# Altium PCB STM32H743I-EVAL2PCBDESIGN.PcbDoc (part 23 of 23)
Units mil, origin at the board's own origin, x right, y up, seen from the top; angles counter-clockwise.
Board outline 6558 x 5417 mil, 8 copper layers (L1_TOP, L2_GND, L3_HS1, L4_POWER, L5_SIG, L6_HS2, L7_GND, L8_BOTTOM), stack 61.368 mil thick; 620 components, 588 nets, 2945 pads, 1724 vias.
Unrouted connection lines stored in the file: 1.
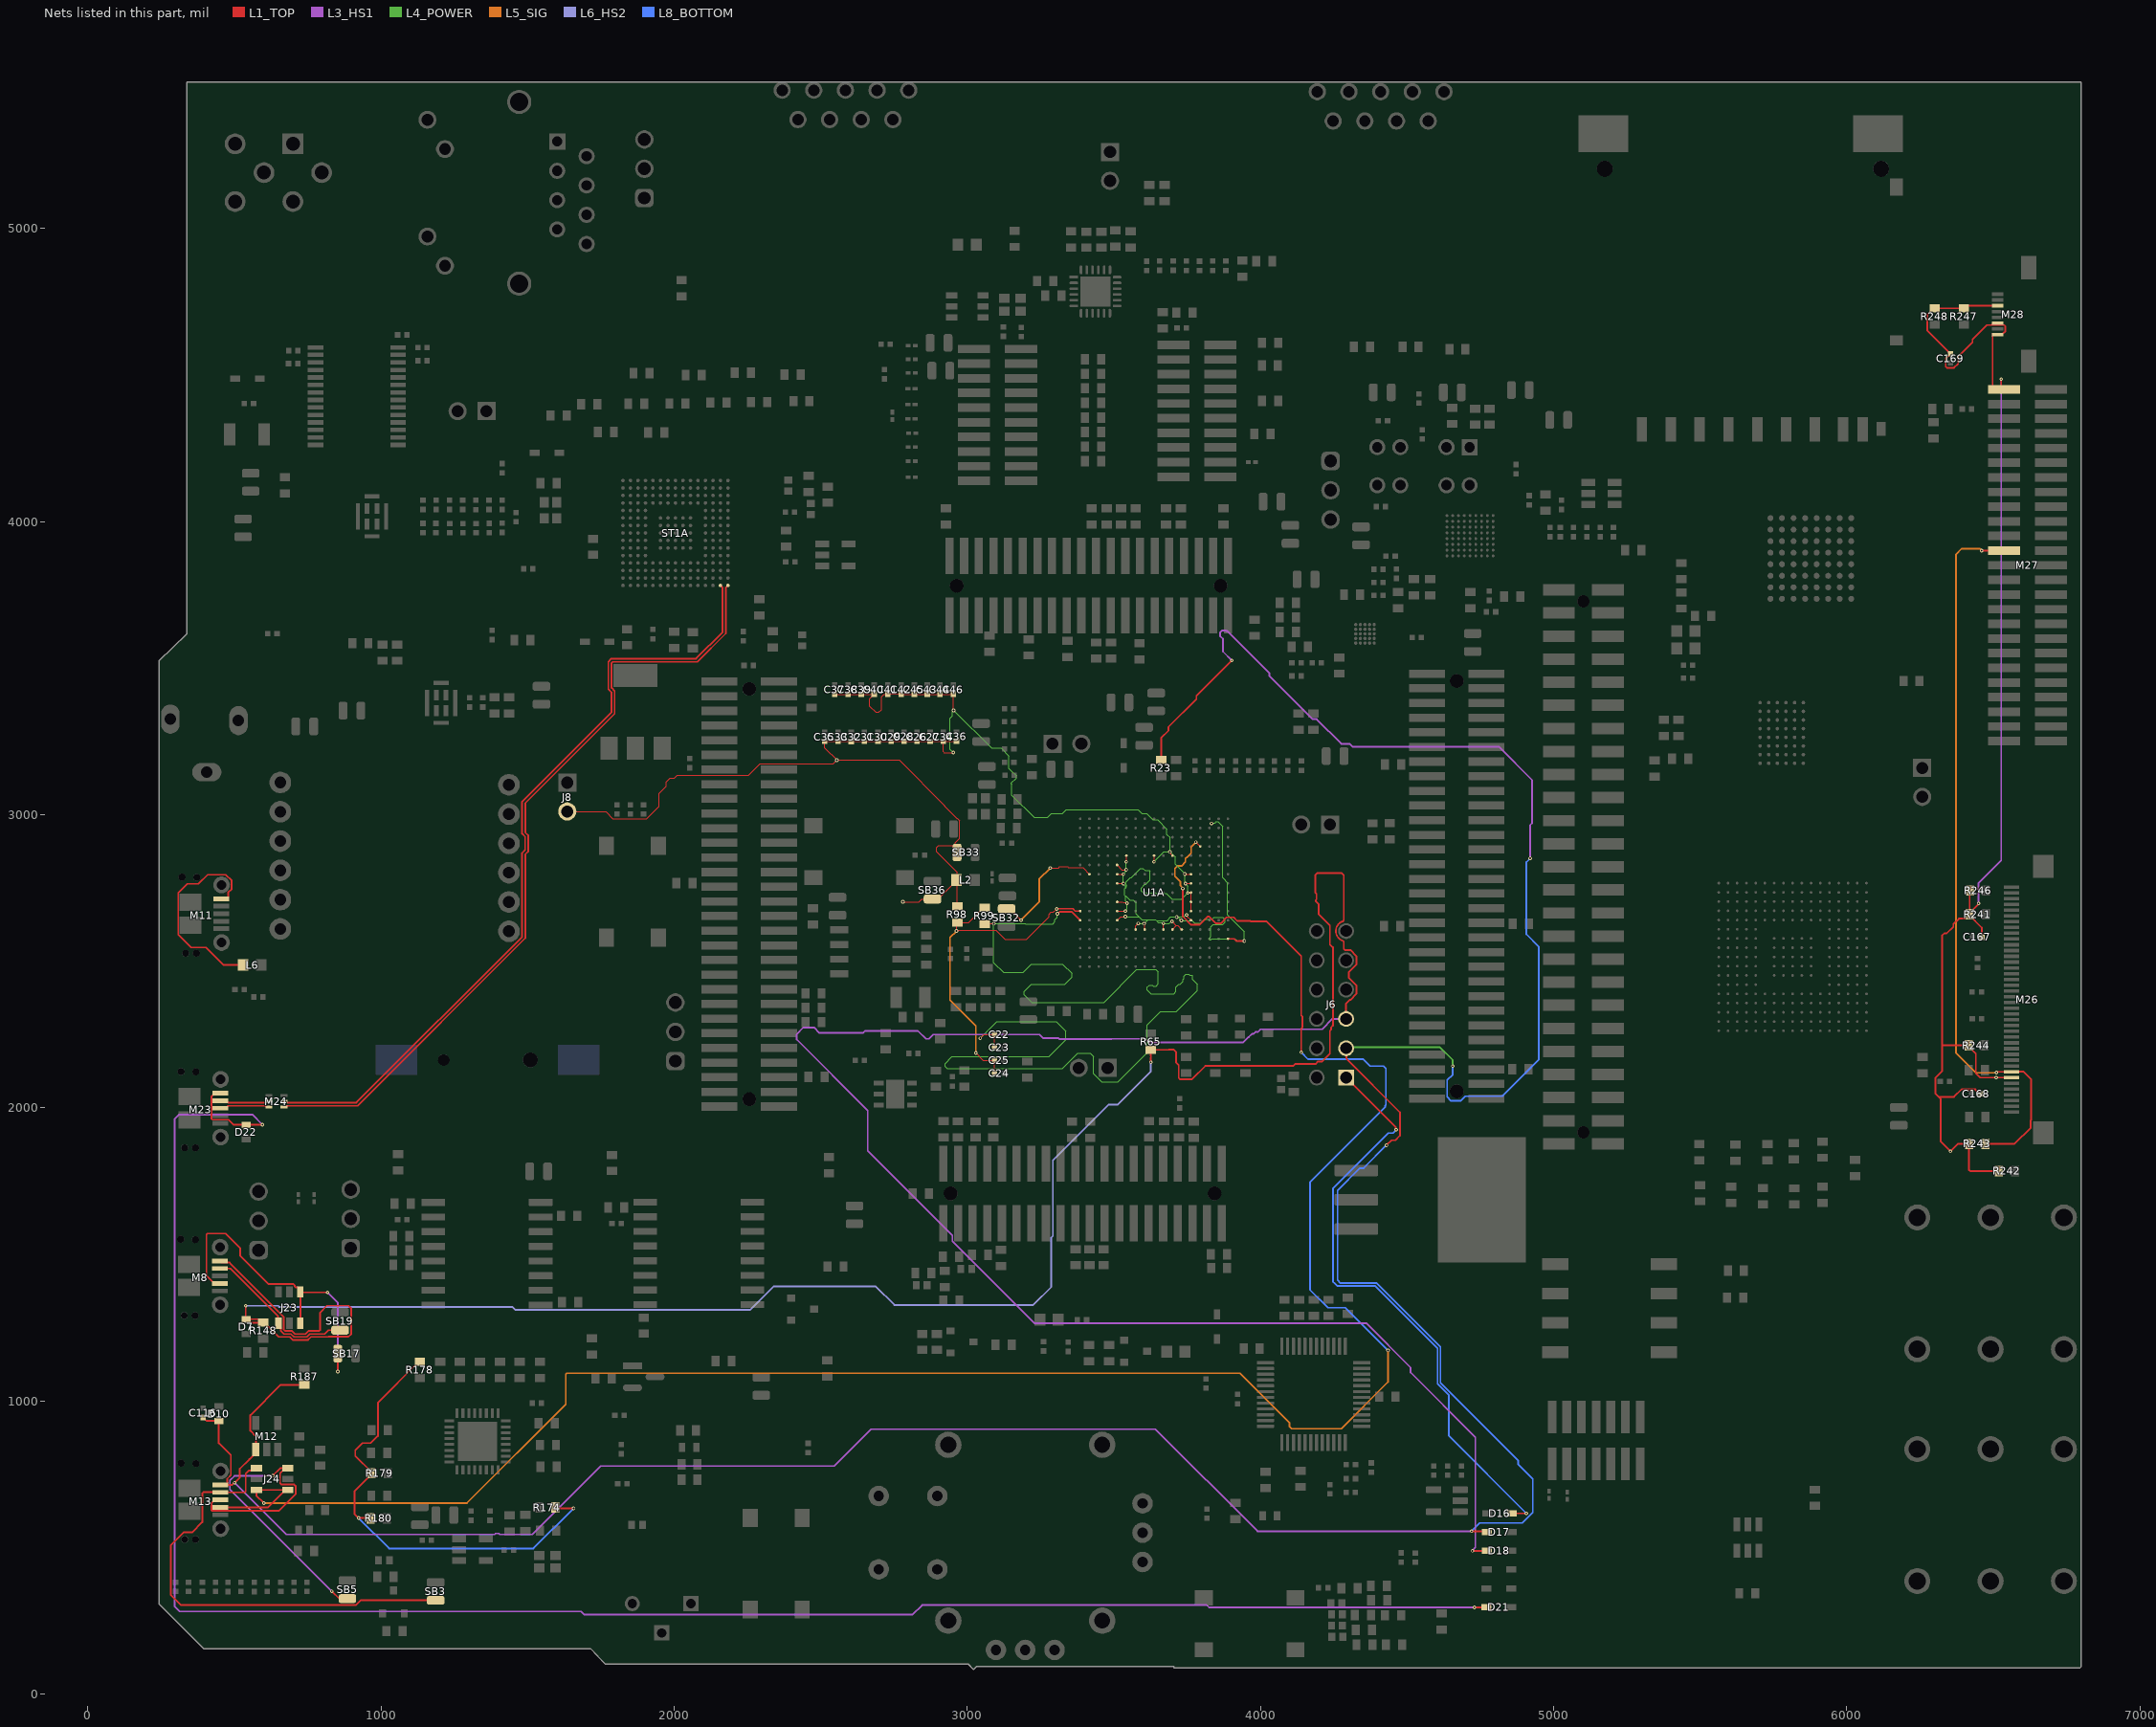
[diagram p20: the nets of this part, all layers, seen from the top]

## Via types
v1: diameter 12, hole 6, L1_TOP to L8_BOTTOM, tented both sides, 1724 vias

## Nets (pads, with @x,y where several pads share a name; then routed paths per layer and width w, separated by ;. In a path a pad name is that pad's centre, name@x,y a point inside that pad or via, vN(x,y) a via of type N, cw(c..) or ccw(c..) an arc to the next point about the centre after c; other vN are vias at no path point) (continued)
USB_DEV_HS_CN_N: M23.2 M24.5 | length 170.5
  L1_TOP w6: M23.2@451.31,2023.96 456.31,2018.96 477.03,2018.96 478.33,2017.66 606.18,2017.66 610.52,2022 M24.5@617.41,2022
USB_DEV_HS_CN_P: M23.3 M24.6 | length 171.3
  L1_TOP w6: M23.3@451.31,1998.37 469.81,1998.37 478.1,2006.66 606.18,2006.66 610.52,2002.31 M24.6@617.41,2002.31
USB_DEV_HS_N: M24.2 ST1A.R14 | length 2719.5
  L1_TOP w6: M24.2@668.59,2022 675.48,2022 679.82,2017.66 915.3,2017.66 1481,2583.36 1481,2869.22 1491,2879.22 1491,2924.78 1481,2934.78 1481,3044.3 1785.56,3348.86 1785.56,3417.83 1775.2,3428.19 1775.2,3521.84 1785.74,3532.39 2074.39,3532.39 2165.02,3623.02 2165.02,3774.75 ST1A.R14@2157.72,3782.05
USB_DEV_HS_P: M24.1 ST1A.R15 | length 2737.7
  L1_TOP w6: M24.1@668.59,2002.31 675.48,2002.31 679.82,2006.66 919.85,2006.66 1492,2578.8 1492,2864.66 1502,2874.66 1502,2929.34 1492,2939.34 1492,3039.75 1796.56,3344.31 1796.56,3422.38 1786.2,3432.75 1786.2,3517.28 1790.3,3521.39 2078.94,3521.39 2176.02,3618.46 2176.02,3774.75 ST1A.R15@2183.31,3782.05
USB_FS1_DM: J23.4 M8.2 SB19.1 | length 540.4
  L1_TOP w6: M8.2@449.61,1451.59 483.41,1451.59 484,1451 486.4,1451 648.41,1288.99 648.41,1265.44 J23.4@649.6,1264.25 649.6,1256 657.6,1248 657.6,1239.36 668.96,1228 692.22,1228 702.22,1218 746.59,1218 756.59,1228 806.65,1228 819.65,1241 SB19.1@860,1241
USB_FS1_ID: J23.1 J23.6 M8.4 SB17.1 | length 1169.2
  L1_TOP w6: M8.4@449.61,1400.41 431.11,1400.41 420.66,1410.86 420.35,1410.86 404.09,1427.12 404.09,1438.56 404.09,1567.09 407.93,1570.93 469.86,1570.93 519,1521.78 519,1495 616,1398 700.9,1398 705,1393.9 705,1390.36 708.51,1386.84 716.4,1386.84 724.4,1378.84 J23.1@724.4,1371.75 ; J23.6@724.4,1264.25 J23.1@724.4,1371.75 ; v1(817,1370) 726.15,1370 J23.1@724.4,1371.75 ; v1(852,1100) SB17.1@852,1161
  L3_HS1 w6: v1(817,1370) 852,1335 v1(852,1100)
USB_FS2_DM: J24.4 M13.2 SB3.1 | length 1588.3
  L1_TOP w6: J24.4@574.25,770.4 566.25,762.4 549.36,762.4 538,751.04 538,691.11 534.49,687.59 M13.2@451.61,687.59 451.14,688.06 393.57,688.06 390.05,684.55 390.05,654.74 390.05,586.05 354.86,550.86 325.57,550.86 282.7,507.98 282.7,337.22 316.92,303 913.51,303 929.51,319 SB3.1@1186,319
USB_FS2_DP: J24.3 M13.3 SB5.1 | length 1314.2
  L1_TOP w6: M13.3@451.61,662 433.11,662 421.11,650 421.11,626.75 423.45,624.41 650.71,624.41 708,681.7 708,709.5 703.2,714.3 660.3,714.3 655.5,719.1 655.5,752.4 J24.3@673.5,770.4 ; v1(630,744) 656.4,770.4 J24.3@673.5,770.4 ; J24.3@681.75,770.4 J24.3@673.5,770.4 ; v1(832,350) 857,325 SB5.1@885,325
  L3_HS1 w6: v1(630,744) 500,744 484,728 484,698 v1(832,350)
USB_FS2_ID: J24.1 J24.6 M13.4 U1A.D14 | length 7431
  L1_TOP w2: v1(3779.53,2906.46) U1A.D14@3794.5,2891.49
  L1_TOP w6: M13.4@451.61,636.41 614.31,636.41 J24.1@673.5,695.6 ; v1(600,651) 574.25,676.75 J24.6@574.25,695.6 J24.1@673.5,695.6 ; J24.1@681.75,695.6 J24.1@673.5,695.6 ; v1(3735,2748) 3735,2652.62 3763.62,2624 3790.9,2624 3818.9,2652 3825.43,2652 3848.43,2629 3864.32,2629 3884.84,2649.52 3908.46,2649.52 3920.98,2637 3965.62,2637 3966.62,2636 4020.38,2636 4139,2517.38 4139,2314.7 4143.45,2310.26 4143.45,2274.64 4139,2270.19 v1(4139,2189)
  L5_SIG w6: v1(600,651) 1293,651 1630,988 1630,1090.49 1633.51,1094 3930,1094 4098.78,925.22 4098.78,912.18 4106.4,904.56 4275.63,904.56 4435,1063.93 v1(4435,1172) ; v1(3735,2748) 3735,2749.62 3727,2757.62 3727,2770.38 3708,2789.38 3708,2816.62 3716.39,2825 3730.53,2825 3744,2838.47 3744,2850.49 3747.51,2854 3748.53,2854 3763.45,2868.93 3763.45,2889.35 3779.53,2905.43 v1(3779.53,2906.46)
  L8_BOTTOM w6: v1(4139,2189) 4162.62,2165.38 4351,2165.38 4374.38,2142 4420.38,2142 4428,2134.38 4428,2010.34 4425,2007.34 4425,2001.72 4169,1745.72 4169,1378.9 4230.45,1317.45 4289.55,1317.45 v1(4435,1172)
VBUS-HS: L6.2 M11.1 | length 709
  L1_TOP w6: M11.1@454.61,2713.18 473.11,2713.18 478.11,2718.18 478.11,2734.15 490.09,2746.13 490.09,2774.72 469.88,2794.93 408.21,2794.93 377.01,2763.73 338.99,2763.73 307.8,2732.53 307.8,2591.47 352.27,2547 402.83,2547 462.83,2487 L6.2@528.9,2487
VBUS_FS1: D7.1 D18.2 J6.05 M8.1 R65.1 R148.1 | length 12508.7
  L1_TOP w6: M8.1@449.61,1477.18 454.61,1472.18 476.56,1472.18 476.62,1472.11 481.88,1472.11 487.41,1466.59 667.6,1286.4 667.6,1243.5 673.1,1238 696.36,1238 706.36,1228 742.44,1228 752.44,1238 788.49,1238 792,1241.51 792,1301.38 814.62,1324 888.51,1324 898,1314.51 898,1228.49 888.51,1219 821.2,1219 820.2,1218 760.73,1218 750.73,1208 698.08,1208 688.08,1218 650.55,1218 612.77,1255.78 612.72,1255.78 609.72,1258.78 609.72,1277.34 604.19,1277.34 602.97,1278.56 D7.1@544.92,1278.56 ; v1(538,1324) 538,1279.61 D7.1@540,1277.61 ; D7.1@544.92,1277.61 555.97,1266.56 R148.1@598,1266.56 ; v1(3626,2155) 3626,2171.32 3626.22,2171.54 3626.22,2176.51 3626,2176.73 R65.1@3626,2197.44 3686.62,2197.44 3687.18,2198 3704.38,2198 3712,2190.38 3712,2154.85 3721.28,2145.57 3721.28,2101.76 3725.38,2097.66 3766.62,2097.66 3811.73,2142.78 4111.16,2142.78 4117.62,2149.24 4187.73,2149.24 4196.5,2158 4210.64,2158 4237,2184.36 4237,2198.5 4237,2262.72 4241,2266.72 4241,2274.22 4247,2280.22 4247,2547.28 4237,2557.28 4237,2621.64 4199,2659.64 4199,2693.69 4188.95,2703.74 4188.95,2708.71 4191.35,2711.12 4191.35,2730.17 4187,2734.53 4187,2793.38 4194.62,2801 4276,2801 4284,2793 4284,2639.05 4282.24,2637.29 4281.26,2636.31 ccw(c4292,2603) 4281.26,2569.69 4282.24,2568.71 4284,2566.95 4284,2541.51 4287.51,2538 4306.5,2538 4327,2517.5 4327,2488.5 4301.11,2462.61 4301.11,2443.39 4306.5,2438 4327,2417.5 4327,2388.5 4306.5,2368 4304,2368 4292,2356 J6.05@4292,2303 ; v1(4723,488) D18.2@4771.87,488
  L3_HS1 w6: J6.05@4292,2303 4245.76,2303 4210.76,2268 4000.82,2268 3991.23,2258.41 3983.08,2258.41 3977.38,2252.72 3972,2252.72 3960.28,2241 3959.67,2241 3941.67,2223 3619.62,2223 3607.62,2235 3491.33,2235 3490.33,2234 3314.47,2234 3311.47,2237 3258.57,2237 3245.57,2250 2884.38,2250 2869.38,2235 2858.62,2235 2831.62,2262 2650.57,2262 2643.57,2255 2495.67,2255 2476.67,2274 2440.51,2274 2418,2251.49 2418,2232.57 2660,1990.57 2660,1852.72 2949,1563.72 2949,1544.62 3228.62,1265 4360.38,1265 4512,1113.38 4512,1096.62 4733,875.62 4733,499.21 4723,489.21 v1(4723,488)
  L6_HS2 w6: v1(538,1324) 648.62,1324 652.62,1320 1448.88,1320 1458.88,1310 2259.14,1310 2339.14,1390 2687.93,1390 2750.93,1327 3225,1327 3286,1388 3286,1556.47 3292,1562.47 3292,1820.38 3482.62,2011 3513.47,2011 3626,2123.53 v1(3626,2155)
VBUS_FS2: C116.1 D10.1 D17.2 J6.03 M12.1 M13.1 R23.1 R187.1 | length 11544.2
  L1_TOP w6: C116.1@393,943.17 393.08,943.17 404.86,931.39 D10.1@446,931.39 446,855.4 487.09,814.3 487.09,746.13 475.11,734.15 475.11,718.18 M13.1@470.11,713.18 ; M13.1@451.61,713.18 M13.1@470.11,713.18 ; R187.1@738,1054.44 657.43,1054.44 553.79,950.8 553.79,897.75 572.6,878.94 M12.1@572.6,833.72 572.6,821.91 551.46,800.77 550.33,800.77 518,768.44 518,738 v1(500,720) 498.38,720 491.56,713.18 M13.1@470.11,713.18 ; R23.1@3661,3186.56 3661,3261.33 3686,3286.33 3686,3299 3781.6,3394.6 3781.6,3405.78 v1(3902.2,3526.37) ; J6.03@4292,2203 4293.31,2201.69 4293.31,2167 4476,1984.31 4476,1905 4460.07,1889.07 4447.07,1889.07 v1(4430,1872) ; v1(4720,555) 4769.87,555 D17.2@4772.87,552
  L3_HS1 w6: v1(500,720) 676,544 1387.62,544 1390.62,547 1401.38,547 1404.38,544 1515.05,544 1748.55,777.5 2545.64,777.5 2671.14,903 3641.71,903 3989.71,555 v1(4720,555) ; v1(3902.2,3526.37) 3872,3556.57 3872,3600.12 3862,3610.12 3862,3620.89 3869.62,3628.5 3880.38,3628.5 3881.89,3627 3885.28,3627 4030.63,3481.66 4030.63,3472.85 4177.47,3326 4191.62,3326 4275.62,3242 4303.47,3242 4313.47,3232 4812.41,3232 4927,3117.41 4927,2971.37 4920,2964.37 v1(4920,2851)
  L4_POWER w6: J6.03@4292,2203 4295,2206 4612.47,2206 4656,2162.47 v1(4656,2142)
  L8_BOTTOM w6: v1(4430,1872) 4351.93,1793.93 4338.93,1793.93 4263,1718 4263,1412 4273.5,1401.5 4396.5,1401.5 4614,1184 4614,1062 4879,797 4879,783.47 4929,733.47 4929,619.62 4892.77,583.38 4748.38,583.38 v1(4720,555) ; v1(4656,2142) 4656,2113.38 4637,2094.38 4637,2037 4650.43,2023.57 4682.93,2023.57 4698.35,2039 4824,2039 4949,2164 4949,2550.19 4907,2592.19 4907,2838 v1(4920,2851)
VBUS_HS: D16.2 J6.01 | length 2054.6
  L1_TOP w6: J6.01@4292,2103 4461.85,1933.15 4461.85,1926.15 v1(4463,1925) ; D16.2@4858.13,616 v1(4907,616)
  L8_BOTTOM w6: v1(4463,1925) 4451.72,1913.72 4436,1913.72 4247,1724.72 4247,1406.51 4251.51,1402 4251.86,1402 4262.36,1391.5 4391.5,1391.5 4604,1179 4604,1057.43 4642.93,1018.5 4642.93,880.07 v1(4907,616)
VDD: C167.1 C168.1 C169.1 M26.7 M27.50 M28.1 M28.3 M28.6 R241.2 R242.2 R243.2 R244.2 R246.2 R247.2 R248.2 | length 4790.4
  L1_TOP w6: R246.2@6420.44,2741 6419.44,2740 6419.44,2700 6419.44,2663.94 6448.85,2693.35 6448.85,2695.85 v1(6450,2697) ; C168.1@6457.83,2047 6457.83,2047.08 6451.62,2053.3 6445.9,2053.3 6442.38,2056.82 6442.38,2059.2 6438.28,2063.3 6392.51,2063.3 6366.1,2036.89 6313.79,2036.89 ; C167.1@6460.83,2582 6460.83,2614.67 6419.44,2656.06 6408.66,2645.28 6382.9,2645.28 6364,2626.38 6364,2617.72 6341.28,2595 6332.62,2595 6325,2587.38 6325,2213 ; M28.1@6514.56,4638.1 6514.56,4638.37 6511.92,4641.01 6498.5,4641.01 6497.87,4640.38 6497.87,4462.5 6509.37,4451 M27.50@6537,4451 6527,4461 v1(6527,4486) ; M28.1@6514.56,4641.01 6531.24,4641.01 6535.12,4644.88 6537.14,4644.88 6541.24,4648.98 6541.24,4666.59 6537.14,4670.69 6494,4670.69 ; M28.3@6514.56,4677.47 6500.78,4677.47 6494,4670.69 ; M28.6@6514.56,4736.53 6408.97,4736.53 R247.2@6400,4727.56 R248.2@6300,4727.56 6296.06,4727.56 6275.28,4706.78 6275.28,4651.46 6353.92,4572.83 6337.7,4556.62 6337.7,4529.05 6341.8,4524.95 6366.2,4524.95 6380.3,4539.05 6380.3,4563.45 6429.09,4612.24 6429.09,4622.09 6477.69,4670.69 6494,4670.69 ; R242.2@6519.44,1784 6420.96,1784 6417.44,1787.51 R243.2@6417.44,1877 6380,1877 v1(6354,1851) 6321,1884 6321,2029.68 6313.79,2036.89 ; M26.7@6562.06,2103.21 6561.98,2103.13 6510.13,2103.13 v1(6510,2103) 6455.16,2103 6440.55,2117.61 6440.55,2183.95 6415.44,2209.06 R244.2@6415.44,2213 6325,2213 ; 6313.79,2036.89 6302.78,2047.9 6302.78,2102.2 6325,2124.42 6325,2213
  L3_HS1 w6: v1(6450,2697) 6450,2767 6527,2844 v1(6527,4486)
VDD_IO: R174.1 R178.1 R179.1 R180.1 | length 1633.7
  L1_TOP w6: R180.1@964.44,599 963.44,600 v1(923,600) 909,614 909,690.62 967.44,749.06 R179.1@967.44,753 967.44,756.94 912,812.38 912,831.38 936.28,855.66 964.5,855.66 988.78,879.94 988.78,993.28 1128.06,1132.56 R178.1@1132,1132.56 ; R174.1@1594.56,636 1597.84,632.72 v1(1656.43,632.72)
  L8_BOTTOM w6: v1(923,600) 1027,496 1519.71,496 v1(1656.43,632.72)
VDD_MCU: C26.1 C27.1 C28.1 C29.1 C30.1 C31.1 C32.1 C33.1 C34.1 C35.1 C36.2 C37.1 C38.1 C39.1 C40.1 C41.1 C42.1 C43.1 C44.1 C45.1 C46.1 J8.2 L2.1 R98.2 SB33.1 SB36.1 U1A.E6 U1A.E9 U1A.E11 U1A.F5 U1A.G5 U1A.G13 U1A.H5 U1A.H13 U1A.J13 U1A.K5 U1A.K13 U1A.L5 U1A.L13 U1A.M5 U1A.M13 U1A.N7 U1A.N8 U1A.N10 U1A.N11 U1A.N12 U1A.P17 | length 7284.9
  L1_TOP w4: J8.2@1635,3011 1766.55,3011 1790.77,2986.78 1906.62,2986.78 1948.32,3028.49 1948.32,3072.29 1973,3096.97 1973,3111.11 1985.89,3124 2000.03,3124 2010.03,3134 2253.5,3134 2293.5,3174 2543,3174 v1(2555,3186) ; C37.1@2547,3411.17 C38.1@2593,3411.17 C39.1@2638,3411.17 C40.1@2682,3411.17 2667,3396.17 2667,3370.07 2687.75,3349.31 2697.7,3349.31 2707.3,3358.92 2707.3,3402.43 2716.04,3411.17 C41.1@2729,3411.17 2729.17,3411.33 C42.1@2774,3411.33 2774.17,3411.17 C45.1@2819,3411.17 C43.1@2863,3411.17 C44.1@2907,3411.17 C46.1@2952,3411.17 2953,3410.17 v1(2953,3356) ; v1(2780,2703) 2781,2702 2835,2702 2845,2712 SB36.1@2881,2712 2891.14,2722.14 2909.62,2722.14 L2.1@2963.69,2776.21 ; v1(2952,3212) 2920.34,3212 2918,3214.34 C34.1@2918,3250 ; L2.1@2962.9,2777 L2.1@2963.69,2776.21 ; C36.2@2963,3250.17 2918.17,3250.17 C34.1@2918,3250 ; SB33.1@2965,2871 SB33.1@2959,2877 ; R98.2@2966,2686.56 2966,2773.9 L2.1@2963.69,2776.21 ; U1A.M5@3511.03,2639.52 3511.88,2639.52 3524.36,2652 v1(3539,2652) ; U1A.L5@3511.03,2671.02 v1(3539,2671) ; U1A.K5@3511.03,2702.51 3530.32,2702.51 3533.3,2699.53 3543.47,2699.53 v1(3545,2698) ; U1A.H5@3511.03,2765.5 v1@3531.5,2765.5 ; U1A.G5@3511.03,2797 v1@3531.5,2797 ; U1A.F5@3511.03,2828.5 3527.53,2812 v1(3542,2812) ; v1(3542,2839) 3542.53,2839.53 U1A.E6@3542.53,2859.99 ; U1A.N7@3574.02,2608.02 3574.62,2608.62 3574.62,2620.41 3583,2628.79 v1(3583,2629) ; v1(3603,2628) 3603,2625.84 3605.52,2623.32 U1A.N8@3605.52,2608.02 ; v1@3637.02,2839.53 U1A.E9@3637.02,2859.99 ; U1A.N10@3668.51,2608.02 v1@3668.51,2628.49 ; v1(3691,2873) 3692.53,2871.47 3692.53,2867.47 U1A.E11@3700.01,2859.99 ; v1(3698,2636) 3712,2622 ; U1A.N11@3700.01,2608.02 3712,2620.02 3712,2622 ; U1A.N12@3731.5,2608.02 3717.53,2622 3712,2622 ; v1@3742.54,2797 U1A.G13@3763,2797 ; v1(3744,2765) 3744.25,2765.25 3762.75,2765.25 U1A.H13@3763,2765.5 ; v1(3748,2658) 3749.53,2656.47 3749.53,2652.99 U1A.M13@3763,2639.52 ; v1(3752,2733) 3753.01,2734.01 U1A.J13@3763,2734.01 U1A.K13@3763,2702.51 U1A.L13@3763,2671.02 ; v1(2555,3186) 2767.09,3186 2923,3030.09 2923,3027.75 2963.75,2987 2966.09,2987 2974,2979.09 2974,2918.9 2959,2903.9 SB33.1@2959,2877 ; v1(2555,3186) 2513,3228 C35.1@2513,3250 C33.1@2559,3250 2559.17,3249.83 C32.1@2604,3249.83 2604.17,3250 C31.1@2649,3250 C30.1@2695,3250 C29.1@2740,3250 2740.17,3250.17 C28.1@2784,3250.17 2784.17,3250 C26.1@2828,3250 C27.1@2873,3250 C34.1@2918,3250 ; SB33.1@2959,2877 2952.42,2883.58 2952.42,2894.86 2901.31,2894.86 2894.28,2887.83 2894.28,2874.07 2965,2803.35 2965,2777.53 L2.1@2963.69,2776.21
  L1_TOP w6: U1A.P17@3888.98,2576.53 3909.74,2576.53 3917.27,2569 v1(3945,2569)
  L4_POWER w4: v1(2952,3212) 2941,3223 2941,3329.13 2949,3337.13 2949,3349.84 2953,3353.84 v1(2953,3356) 2954.08,3354.92 3082,3227 3114.73,3227 3142,3199.73 3142,3158.03 3150,3150.03 3150,3149.49 3167.02,3132.47 3167.02,3125.02 3150.37,3108.37 3150.37,3105.06 3152,3103.43 3152,3066.75 3227.75,2991 3273.23,2991 3286.23,3004 3324.25,3004 3337.25,3017 3582.13,3017 3595.13,3004 3611.11,3004 3633.11,2982 3648.97,2982 3681,2949.97 3681,2931.89 3691,2921.89 v1(3691,2873) ; v1(3539,2652) 3585.03,2652 ; v1(3539,2671) 3539,2673.16 3545,2679.16 v1(3545,2698) 3545,2700.16 3539.21,2705.95 3539.21,2723.33 ; v1(3542,2839) v1(3542,2812) 3540.51,2810.51 3540.51,2804.95 v1(3532.02,2796.47) v1(3532.02,2764.98) 3532.02,2762.81 3539.21,2755.62 3539.21,2750.08 ; v1(3583,2629) 3583.5,2628.5 3602.5,2628.5 v1(3603,2628) ; v1@3604,2629 3616.02,2641.02 ; v1(3636.49,2839) 3670.49,2873 v1(3691,2873) ; v1(3669.04,2629.02) 3688.85,2629.02 3695.84,2636 v1(3698,2636) ; v1@3669.04,2632 3651.53,2632 3645.51,2638.02 ; v1@3719.78,2650.75 3738.59,2650.75 3745.84,2658 v1@3747.03,2658 ; v1(3833,2970) 3834.53,2971.53 3844.7,2971.53 3848.66,2975.5 3855.5,2975.5 3871,2960 3871,2784.5 3887.5,2768 3887.5,2658.5 3945,2601 v1(3945,2569) 3921.11,2569 3914.11,2576 3833.89,2576 3830.89,2573 3827.57,2573 3825.23,2575.34 3825.23,2578.66 3830.5,2583.93 3830.5,2617.47 3838.03,2625 3870.73,2625 3879.41,2633.68 3879.41,2641.14 3871.54,2649 3841.4,2649 3835.4,2643 3808.89,2643 3795.89,2630 3774.97,2630 3765.97,2639 v1(3730,2639) 3719.78,2649.22 3715.78,2649.22 v1(3714.25,2650.75) 3693.91,2650.75 3681.19,2638.02 3645.51,2638.02 ; 3539.21,2723.33 3547.54,2715 3548.1,2715 3555.1,2708 3565.97,2708 3575.5,2698.47 3575.5,2661.53 3585.03,2652 ; 3539.21,2723.33 3537,2725.54 3537,2747.87 3539.21,2750.08 ; 3539.21,2750.08 3543.06,2753.92 3543.06,2759.04 3541.03,2761.06 3541.03,2771 3555.56,2785.53 3559.8,2785.53 3590.37,2816.1 3598.93,2816.1 3606.03,2809 3615.97,2809 3617.46,2810.49 3620.77,2810.49 3623.12,2808.15 3623.12,2777 3608.11,2762 3605.51,2762 3592.99,2749.48 3592.99,2739.54 3600.33,2732.21 3642.68,2732.21 3643.89,2731 3679.25,2731 3698.25,2712 3731,2712 v1(3752,2733) 3752,2756.03 3744,2764.03 v1(3744,2765) 3743,2766 3743,2794.37 3742.01,2795.36 v1(3742.01,2797.53) 3709,2830.54 3709,2855 v1(3691,2873) ; 3585.03,2652 3595.03,2642 3616.02,2642 3641.53,2642 3645.51,2638.02
VDD_SDC: SB32.1 U1A.G2 | length 430.3
  L1_TOP w4: v1(3283,2818) 3311.4,2818 3315.4,2822 3341.64,2822 3344.13,2819.5 3394.04,2819.5 U1A.G2@3416.54,2797
  L1_TOP w6: SB32.1@3134,2679 3144.34,2679 3181.04,2642.3 3181.04,2641.96 v1(3183,2640)
  L5_SIG w6: v1(3183,2640) 3245,2702 3245,2780 v1(3283,2818)
VDDA: C24.1 C25.1 R98.1 R99.2 U1A.L1 | length 1213.7
  L1_TOP w4: R98.1@2966,2631.44 R98.1@2969.94,2631.44 ; v1(3029,2187) 3054,2162 C25.1@3093,2162 3093.17,2161.83 C24.1@3093.17,2117 ; R99.2@3059,2682.56 3055.06,2682.56 3003.94,2631.44 R98.1@2969.94,2631.44 ; v1(3305,2678) 3294,2667 3286.03,2667 3279,2659.97 3279,2652 3202,2575 3127.91,2575 3096.91,2606 2971.66,2606 2970.19,2604.53 2964.53,2604.53 v1(2963,2603) 2963,2604.53 2963,2624.5 R98.1@2969.94,2631.44
  L1_TOP w6: v1(3305,2678) 3306.03,2679.03 3359.68,2679.03 3367.69,2671.02 U1A.L1@3385.05,2671.02
  L5_SIG w6: v1(2963,2603) 2941,2581 2941,2366.67 3029,2278.67 v1(3029,2187)
VREF+: C22.1 C23.1 R99.1 U1A.M1 | length 3950.7
  L1_TOP w4: v1(3044,2237) 3057,2250 C22.1@3093,2250 3093,2206.17 C23.1@3093.17,2206 ; R99.1@3059,2627.44 3059.56,2628 v1(3090,2628)
  L1_TOP w6: v1(3307,2662) 3308.62,2662 3315.65,2669.03 3355.54,2669.03 U1A.M1@3385.05,2639.52
  L4_POWER w4: v1(3044,2237) 3101.09,2294.09 3303.88,2294.09 3336,2261.97 3336,2232.03 3278.97,2175 2948.03,2175 2924,2150.97 2924,2141.03 2931.03,2134 3324.25,2134 3376.25,2186 3418.97,2186 3430.42,2174.55 3430.42,2116.12 3458.54,2088 3513.39,2088 3613.83,2188.43 3613.83,2282.8 3659.03,2328 3712.97,2328 3784.99,2400.02 3784.99,2420.98 3768.97,2437 3768.97,2453 3758.97,2453 3755.97,2456 3745.34,2456 3739,2449.66 3739,2441.11 3736,2438.11 3736,2430.73 3726.12,2420.85 3721.88,2420.85 3712,2410.97 3712,2396.03 3704.97,2389 3626.03,2389 3614,2401.03 3614,2410.97 3621.03,2418 3631,2418 3634,2415 3643.97,2415 3651,2422.03 3651,2462.97 3642.97,2471 3577.97,2471 3466.86,2359.89 3219.14,2359.89 3193,2386.03 3193,2395.97 3217.53,2420.5 3332.47,2420.5 3357,2445.03 3357,2458.11 3325.11,2490 3218.13,2490 3190.13,2462 3123.03,2462 3090,2495.03 v1(3090,2628) 3197.23,2628 3198.23,2627 3290.97,2627 3298.22,2634.25 3298.22,2642.3 3305.92,2650 3305.92,2660.92 v1(3307,2662)
VSYNC: M26.8 M27.28 R243.1 | length 2517.7
  L1_TOP w6: v1(6460,3901) M27.28@6537,3901 ; R243.1@6472.56,1877 6573,1877 6627.94,1931.94 6627.94,1956.55 6629,1957.6 6629,2098 6604.06,2122.94 M26.8@6562.11,2122.94 6561.64,2122.47 6515.09,2122.47 6512.62,2120 v1(6511,2120)
  L5_SIG w6: v1(6460,3901) 6453,3908 6392.51,3908 6373,3888.49 6373,2186.28 6440.28,2119 6510,2119 v1(6511,2120)
VUSB_ST_LINK: D21.2 D22.1 M23.1 | length 6781.3
  L1_TOP w6: M23.1@451.31,2049.55 432.81,2049.55 420.81,2037.55 420.81,1963.12 424.75,1959.19 479.47,1959.19 497.05,1941.61 D22.1@539,1941.61 539.39,1942 v1(595,1942) ; v1(4730,295) 4769.87,295 D21.2@4770.87,296
  L3_HS1 w6: v1(595,1942) 560.31,1976.69 310.51,1976.69 295,1961.18 295,299.14 313.14,281 1682.14,281 1693.14,270 2812.49,270 2845.49,303 3816.71,303 3824.71,295 v1(4730,295)
pads on no net: B1. C96.2 CN2. CN3. D5.1 D6.4 D6.6 D26.1 D32.1 J9.3 J13.2 J13.NC J14.NC J18.6 J19.6 J20.06 J20.08 J23.5 J24.5 J26.1 J26.2 J26.9 J27.7 M1.A4 M1.A5 M1.A6 M1.A10 M1.A11 M1.A12 M1.A13 M1.A14 M1.A15 M1.A16 M1.A17 M1.B4 M1.B5 M1.B6 M1.B10 M1.B11 M1.B12 M1.B13 M1.B14 M1.B15 M1.B16 M1.B17 M1.C4 M1.C5 M1.C6 M1.C10 M1.C11 M1.C12 M1.C13 M1.C14 M1.C15 M1.C16 M1.C17 M1.D4 M1.D5 M1.D6 M1.D10 M1.D11 M1.D12 M1.D13 M1.D14 M1.D15 M1.D16 M1.D17 M1.E3 M1.E4 M1.E5 M1.E6 M1.E7 M1.E10 M1.E11 M1.E12 M1.E13 M1.E14 M1.E15 M1.E16 M1.E17 M1.F4 M1.F5 M1.F13 M1.F16 M1.F17 M1.G4 M1.G5 M1.G10 M1.G11 M1.G13 M1.G14 M1.G15 M1.G16 M1.G17 M1.H3 M1.H4 M1.H5 M1.H7 M1.H10 M1.H11 M1.H13 M1.H14 M1.H15 M1.H16 M1.H17 M1.J4 M1.J5 M1.J10 M1.J11 M1.J13 M1.J14 M1.J15 M1.J16 M1.J17 M1.K2 M1.K3 M1.K4 M1.K5 M1.K10 M1.K11 M1.K13 M1.K14 M1.K15 M1.K16 M1.K17 M1.L4 M1.L5 M1.L10 M1.L11 M1.L13 M1.L14 M1.L15 M1.L16 M1.L17 M1.M4 M1.M5 M1.M16 M1.M17 M1.N4 M1.N5 M1.N6 M1.N10 M1.N11 M1.N12 M1.N13 M1.N14 M1.N15 M1.N16 M1.N17 M1.P4 M1.P5 M1.P6 M1.P10 M1.P11 M1.P12 M1.P13 M1.P14 M1.P15 M1.P16 M1.P17 M1.R4 M1.R5 M1.R6 M1.R10 M1.R11 M1.R12 M1.R13 M1.R14 M1.R15 M1.R16 M1.R17 M1.T1 M1.T2 M1.T3 M1.T4 M1.T5 M1.T6 M1.T7 M1.T8 M1.T9 M1.T10 M1.T11 M1.T12 M1.T13 M1.T14 M1.T15 M1.T16 M1.T17 M1.U1 M1.U2 M1.U3 M1.U4 M1.U5 M1.U6 M1.U7 M1.U8 M1.U9 M1.U10 M1.U11 M1.U12 M1.U13 M1.U14 M1.U15 M1.U16 M1.U17 M2.E3 M2.E6 M3.A1 M3.A8 M3.B1 M3.C1 M3.D1 M3.E1 M3.E8 M3.F8 M3.G1 M3.G8 M3.H1 M4.A6 M4.A8 M4.A9 M4.B1 M4.B4 M4.B5 M4.B7 M4.B8 M4.B9 M4.C3 M4.C4 M4.C5 M4.C7 M4.C8 M4.E1 M4.E5 M4.F4 M4.F5 M4.F6 M4.F8 M4.F9 M4.G4 M4.H2 M4.H3 M4.H4 M4.H5 M5. M5.24 M5.41 M5.42 M5.44 M5.46 M5.48 M7.7 M8.11 M8.S_1_H1 M8.S_1_H2 M8.S_2_H1 M8.S_2_H2 M10.12 M10.15 M10.16 M11.11 M11.S_1_H1 M11.S_1_H2 M11.S_2_H1 M11.S_2_H2 M13.11 M13.S_1_H1 M13.S_1_H2 M13.S_2_H1 M13.S_2_H2 M14.4 M14.8 M14.9 M14.11 M14.12 M14.14 M14.15 M14.18 M14.19 M14.21 M15.1 M15.4 M15.7 M15.9 M16.3 M16.11 M17.3 M17.4 M17.5 M17.6 M17.11 M17.12 M17.13 M17.14 M18.E4 M19. M19.11 M19.12 M19.SH1 M19.SH2 M20.B1A M20.B1B M20.B2A M20.B2B M20.S3 M20.S4 M23.4 M23.S_1_H1 M23.S_1_H2 M23.S_2_H1 M23.S_2_H2 M24.4 M25.3 M25.4 M25.5 M25.6 M25.10 M25.11 M25.12 M25.13 M25.14 M25.25 M25.38 M25.41 M26.2 M26.M1 M26.M2 M27.03 M27.04 M27.05 M27.06 M27.21 M27.23 M27.24 M27.41 M27.42 M27.44 M27.46 M27.48 M28.9 M28.10 M29. M29.19 M29.21 M29.22 M29.25 M29.34 M29.35 M29.40 M30. M30.08 M30.27 M30.35 M30.36 M30.38 M30.40 M30.43 M30.46 M30.47 M30.52 M30.54 M30.56 M32.1 M32.4 M32.8 ST1A.A1 ST1A.A2 ST1A.A3 ST1A.A4 ST1A.A5 ST1A.A6 ST1A.A8 ST1A.A9 ST1A.A10 ST1A.A11 ST1A.A12 ST1A.A13 ST1A.B1 ST1A.B2 ST1A.B3 ST1A.B4 ST1A.B5 ST1A.B6 ST1A.B7 ST1A.B8 ST1A.B9 ST1A.B10 ST1A.B11 ST1A.B12 ST1A.B13 ST1A.B14 ST1A.B15 ST1A.C2 ST1A.C3 ST1A.C4 ST1A.C11 ST1A.C12 ST1A.C13 ST1A.C14 ST1A.C15 ST1A.D1 ST1A.D2 ST1A.D3 ST1A.D4 ST1A.D10 ST1A.D11 ST1A.D13 ST1A.D14 ST1A.E1 ST1A.E2 ST1A.E3 ST1A.E4 ST1A.E12 ST1A.E13 ST1A.E14 ST1A.E15 ST1A.F1 ST1A.F4 ST1A.F14 ST1A.F15 ST1A.G4 ST1A.G14 ST1A.G15 ST1A.H1 ST1A.H2 ST1A.H3 ST1A.H4 ST1A.H14 ST1A.H15 ST1A.J2 ST1A.J3 ST1A.J4 ST1A.K1 ST1A.K2 ST1A.K3 ST1A.K12 ST1A.K14 ST1A.K15 ST1A.L1 ST1A.L3 ST1A.L12 ST1A.L13 ST1A.L14 ST1A.L15 ST1A.M2 ST1A.M3 ST1A.M4 ST1A.M5 ST1A.M6 ST1A.M7 ST1A.M12 ST1A.M13 ST1A.M14 ST1A.M15 ST1A.N2 ST1A.N4 ST1A.N5 ST1A.N6 ST1A.N7 ST1A.N11 ST1A.N13 ST1A.N14 ST1A.N15 ST1A.P2 ST1A.P3 ST1A.P5 ST1A.P6 ST1A.P7 ST1A.P8 ST1A.P9 ST1A.P10 ST1A.P11 ST1A.P12 ST1A.P13 ST1A.P14 ST1A.P15 ST1A.R2 ST1A.R3 ST1A.R6 ST1A.R7 ST1A.R8 ST1A.R9 ST1A.R10 ST1A.R11 ST1A.R12 ST1A.R13 SW1.5 U1A.M16 X2.3 X2.4 X3.3 X3.4 X4.3 X4.4

## Polygon pours and split planes (outlines as drawn)
VDD_MCU on L4_POWER "VDD_MCU_L04_P002" (solid, pour order 2): 2949,3211.72 2949,3333.62 2952.97,3337.58 3040.55,3250 2979,3250 2946.5,3217.5 2937,3337 2953,3353 2953,3356 2966,3356 3095,3227 3114.73,3227
GND on L1_TOP "GND_L01_P000" (solid, pour order 0): 3672.31,2722.25 3673,2725.62 3673,2753.2 3698.2,2753.2 3676,2731 3661.57,2731 3661.57,2774.43 3664.8,2771.2 3716.42,2771.2 3723.62,2764 3727,2764 3727,2762.19 3717,2752.19 3724,2745.19 3724,2740 3713.75,2740 3694.75,2721 3673,2721
GND on L2_GND (split plane): 6779.9,109.1 3718.13,109.1 3716.17,110.71 3712.69,112.57 3708.92,113.71 3705,114.1 3032,114.1 3028.08,113.71 3024.31,112.57 3021.41,111.02 3016.95,115.47 3013.9,117.97 3010.43,119.83 3006.66,120.97 3002.74,121.36 1773.92,121.36 1729.04,168.38 1728.86,168.53 1728.71,168.71 1727.37,169.81 1726.05,170.95 1725.85,171.06 1725.67,171.21 1724.13,172.03 1722.62,172.88 1722.4,172.96 1722.19,173.07 1720.53,173.57 1718.88,174.11 1718.64,174.14 1718.42,174.21 1716.69,174.38 1714.97,174.59 1714.73,174.57 1714.5,174.6 402.82,174.6 262.1,315.32 262.1,3516.49 350.98,3602.56 351.09,3602.69 351.21,3602.79 352.36,3604.19 353.53,3605.57 353.61,3605.71 353.71,3605.83 354.56,3607.43 355.44,3609.01 355.49,3609.17 355.57,3609.31 356.09,3611.04 356.65,3612.76 356.66,3612.93 356.71,3613.08 356.89,3614.88 357.09,3616.68 357.08,3616.84 357.1,3617 357.1,5479.9 6779.9,5479.9
GND on L7_GND (split plane): 6779.9,109.1 3718.13,109.1 3716.17,110.71 3712.69,112.57 3708.92,113.71 3705,114.1 3032,114.1 3028.08,113.71 3024.31,112.57 3021.41,111.02 3016.95,115.47 3013.9,117.97 3010.43,119.83 3006.66,120.97 3002.74,121.36 1773.92,121.36 1729.04,168.38 1728.86,168.53 1728.71,168.71 1727.37,169.81 1726.05,170.95 1725.85,171.06 1725.67,171.21 1724.13,172.03 1722.62,172.88 1722.4,172.96 1722.19,173.07 1720.53,173.57 1718.88,174.11 1718.64,174.14 1718.42,174.21 1716.69,174.38 1714.97,174.59 1714.73,174.57 1714.5,174.6 402.82,174.6 262.1,315.32 262.1,3516.49 350.98,3602.56 351.09,3602.69 351.21,3602.79 352.36,3604.19 353.53,3605.57 353.61,3605.71 353.71,3605.83 354.56,3607.43 355.44,3609.01 355.49,3609.17 355.57,3609.31 356.09,3611.04 356.65,3612.76 356.66,3612.93 356.71,3613.08 356.89,3614.88 357.09,3616.68 357.08,3616.84 357.1,3617 357.1,5479.9 6779.9,5479.9

## Text inside footprints (layer, text, board x,y; h text height)
D8: Mechanical 1 "1" at 2908,1413 h40 r180
D9: Mechanical 1 "1" at 801,579 h40 r180
D13: Mechanical 1 "1" at 2418,3659 h40 r270
D15: Mechanical 1 "1" at 2485,3979 h40 r90
J21: Top 3D Body "*" at 2968,4741 h50
J23: Top 3D Body "*" at 694,1350 h50 r270
J24: Top 3D Body "*" at 660,726 h50 r180
LD1: Mechanical 1 "1" at 4090,2017 h40 r90
LD2: Mechanical 1 "1" at 1937,595 h40 r180
LD3: Mechanical 1 "1" at 3060,1469 h40 r180
LD4: Mechanical 1 "1" at 1074,475 h40 r180
LD5: Mechanical 1 "1" at 4326,213 h40 r180
LD6: Mechanical 1 "1" at 4325,252 h40 r180
LD7: Mechanical 1 "1" at 4195,290 h40
LD8: Mechanical 1 "1" at 4325,290 h40 r180
LD9: Mechanical 1 "1" at 2370,4187 h40 r270
M10: Top 3D Body "*" at 1384,954 h50 r270
M14: Top 3D Body "*" at 809.5,4581.5 h50